# Altium PCB Fast_Servo.PCBDOC (part 11 of 11)
Units mm, origin at the board's own origin, x right, y up, seen from the top; angles counter-clockwise.
Board outline 162.48 x 100 mm, 6 copper layers (Top, GP1(GND), L3, L4, P3V3, Bot), stack 1.716 mm thick; 668 components, 491 nets, 2308 pads, 1133 vias.
Unrouted connection lines stored in the file: 2.
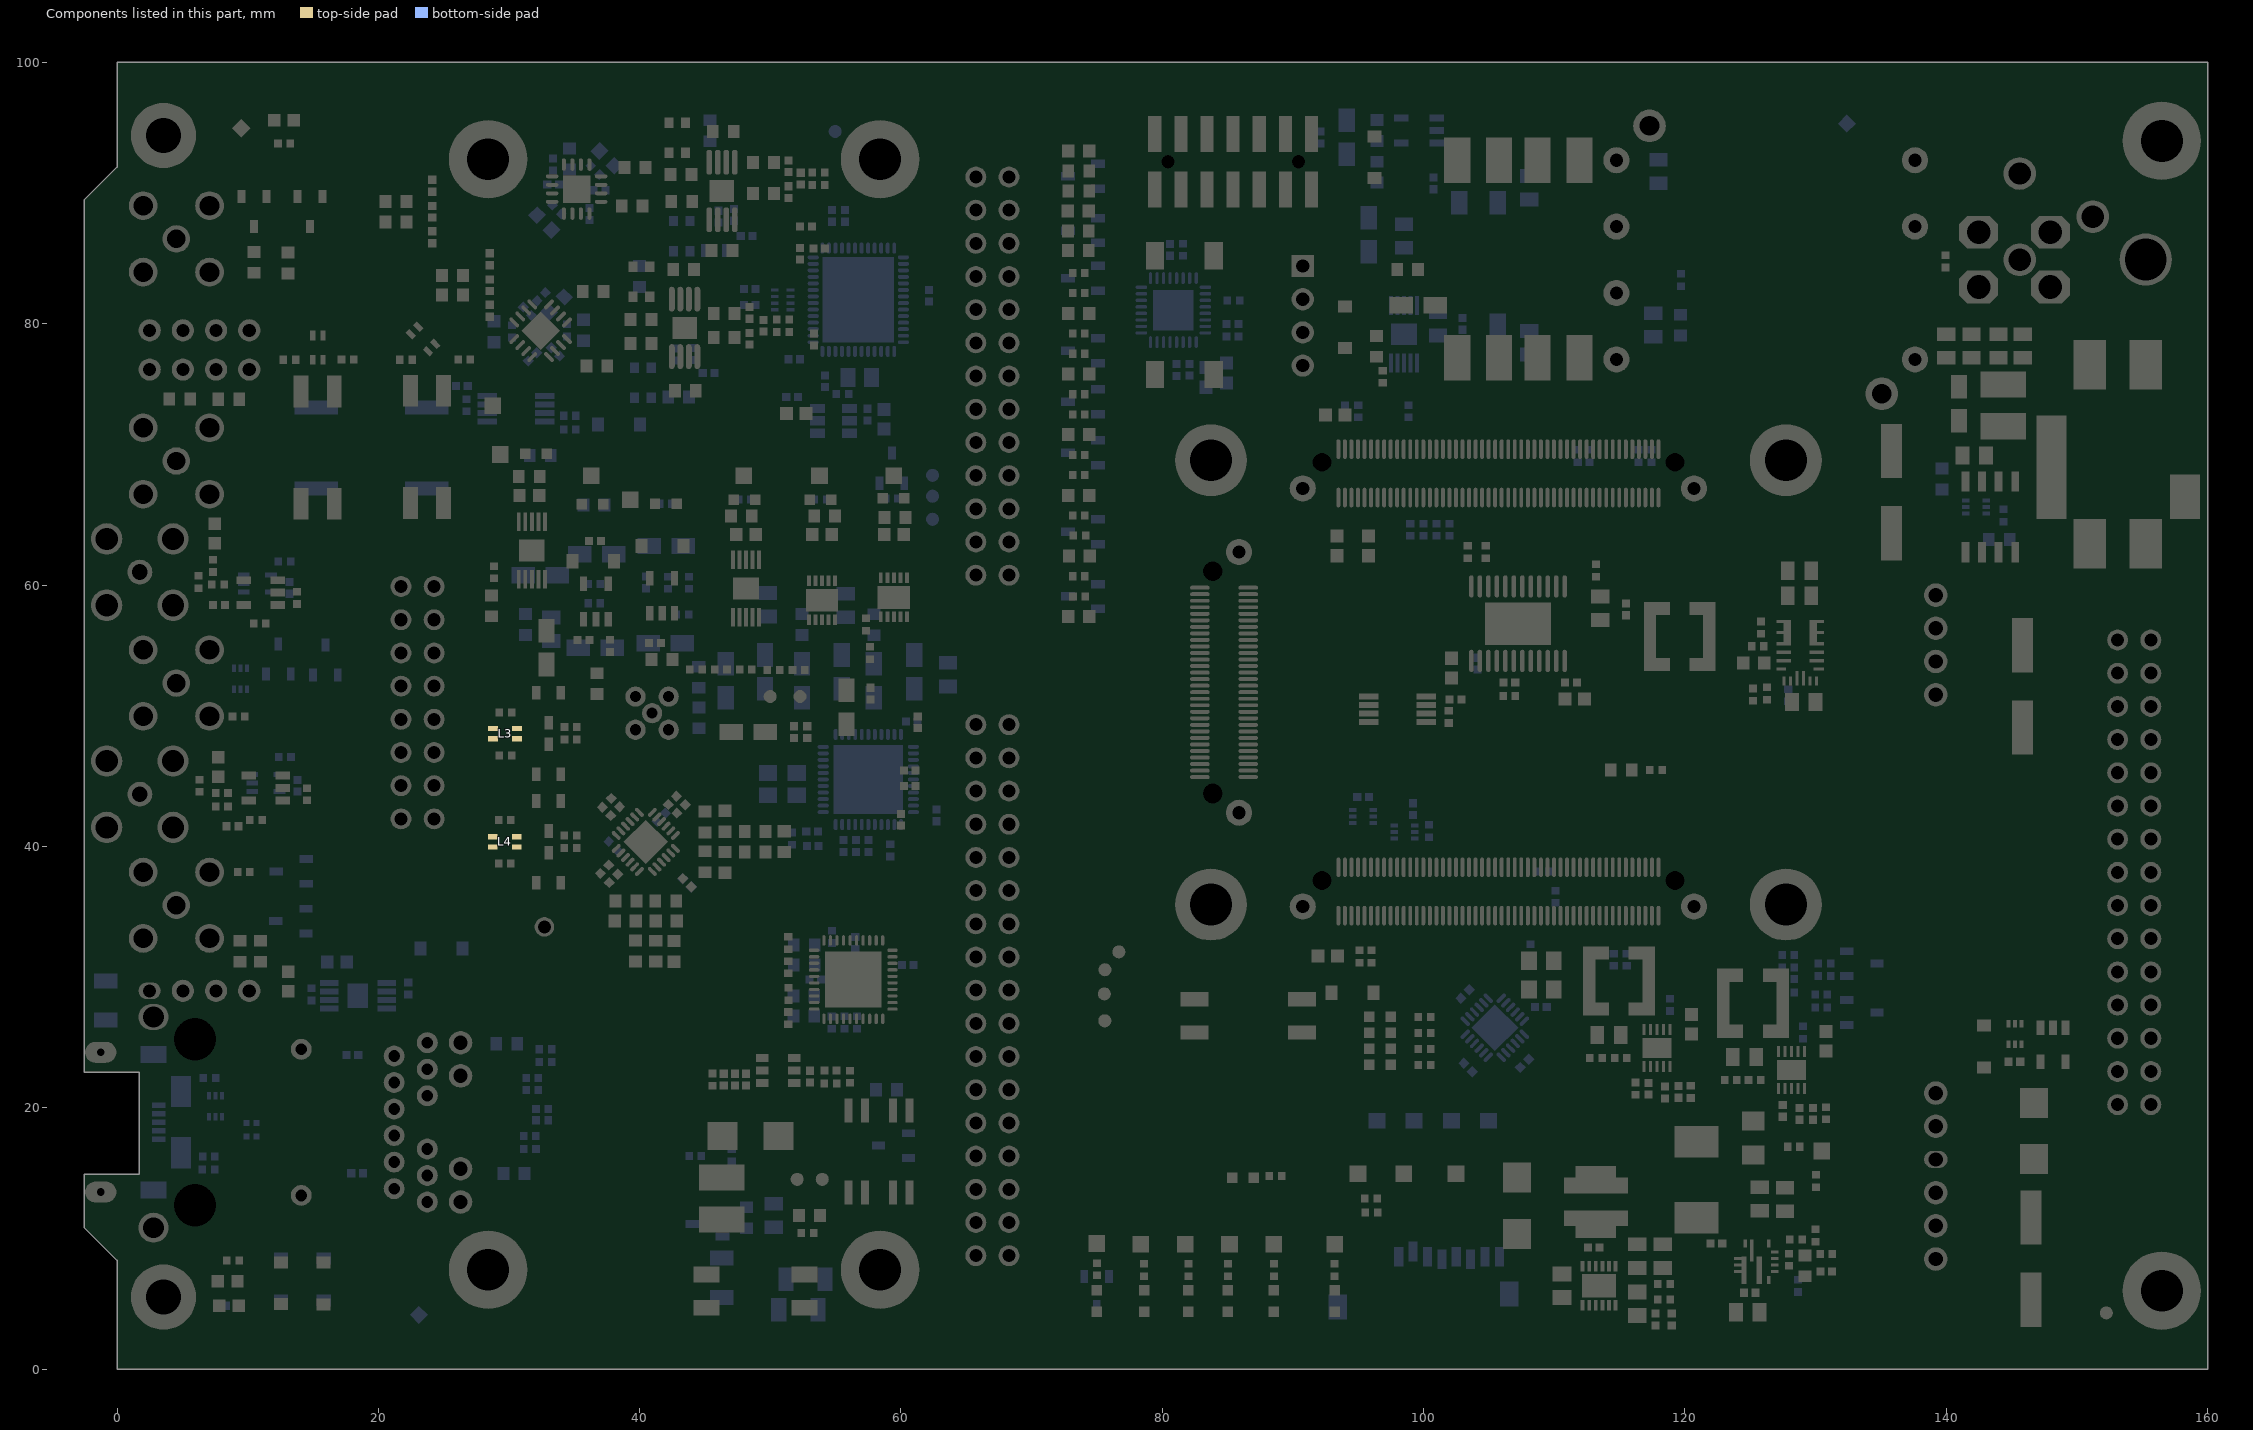
[diagram p13: the components of this part, seen from the top]

## Polygon pours and split planes (outlines as drawn) (continued)
P1V8A on Top "Top-P5V0A" (solid, pour order 304): 60.859,58.084 60.859,58.594 61.542,59.274 61.542,67.176 61.542,67.319 61.047,67.814 56.693,67.814 56.207,68.3 53.75,70.757 53.75,75.555 50.642,75.555 50.642,77.717 53.75,77.717 53.75,86.2 52.824,86.196 52.824,87.9 56.552,87.9 57.226,87.226 63.075,87.226 63.075,47.043 62.648,46.616 62.648,42.637 60.306,40.295 59.748,40.295 58.76,39.307 53.135,39.307 53.135,50.887 57.408,50.85 57.408,54.762 57.364,54.762 57.364,56.53 58.245,56.53 58.245,55.764 58.27,55.739 59.739,55.739 59.739,58.084
P5V5 on Top "Top-P5V5" (solid, pour order 599): 119.238,40.796 124.687,40.796 124.687,49.475 129,49.475 129,51.947 128.825,52.122 128.825,53.597 128.75,53.672 128.375,53.672 128.225,53.522 128.225,52.172 128.075,52.022 124.8,52.022 124.687,51.909 124.687,59.052 119.257,59.059
P3V3_LDO_1 on Top "Top-P6V0 2" (solid, pour order 596): 61.504,65.785 59.331,65.785 59.331,63.08 59.808,62.603 59.808,60.167 61.504,60.167
GND on Top "NONET_L-01_P-001" (solid, pour order 580): 128.918,21.898 128.918,20.644 128.179,19.905 126.941,19.905 126.643,19.607 126.643,18.604 127.316,17.932 131.447,17.932 131.762,18.247 131.762,20.828 130.692,21.898 129.155,21.898
P12V0POE on Top "NONET_L-01_P-001" (solid, pour order 604): 134,66.25 134,62.175 135.75,60.425 135.75,52.57 136.57,51.75 148.75,51.75 150.25,53.25 150.25,58.5 150.168,58.5 146.471,62.197 146.471,63.779 145.75,64.5 140.879,64.5 138.379,67 134.75,67
P12V0 on Top "NONET_L-01_P-001" (solid, pour order 593): 109.15,6.155 111.5,6.155 111.625,6.03 111.625,5.535 111.785,5.375 112.383,5.375 112.438,5.32 112.438,4.103 112.355,4.02 109.445,4.02 109.15,4.315
P5V5_LDO3 on Top "Top-P6V0 2" (solid, pour order 298): 55.971,65.804 54.107,65.804 54.107,62.791 54.276,62.622 54.276,59.82 55.971,59.82
P3V3_LDO_2 on Top "Top-P3V3 1" (solid, pour order 595): 31.853,69.287 31.853,63.674 33.925,63.674 33.925,69.287
N5V5_LDO2 on Top "Top-N2V5A" (solid, pour order 282): 35.78,52.687 35.78,56.566 38.221,56.566 39.57,56.566 39.57,52.687
P5V5_LDO5 on Top "Top-P6V0 2" (solid, pour order 152): 50.177,65.804 48.005,65.804 48.005,63.099 48.482,62.622 48.482,61.217 50.177,61.217
P12V0A on Top "Top-P12V0A" (solid, pour order 450): 92.316,84.388 92.308,79.791 96.625,79.791 96.625,84.4
P13V0 on Top "Top-P13V0" (solid, pour order 412): 99.975,79.941 99.975,73.406 104.176,73.406 104.176,79.941
GND on Top "Top-GND" (solid, pour order 608): 46.092,58.305 46.13,58.266 50.507,58.266 50.506,61.217 47.385,61.217 47.99,64.595 46.112,64.595 46.112,58.325
P5V0A on Top "Top-P5V0A" (solid, pour order 506): 52.694,70.75 53.957,70.75 53.957,71.973 53.937,71.993 53.937,74.914 51.8,74.914 51.8,71.993 40.245,71.993 40.245,67.707 43.108,67.707 43.763,67.176 50.105,67.201 50.125,58.445 48.06,58.445 48.06,54.204 51.8,54.204 51.8,69.856
GND on Top "Top-GND 12" (solid, pour order 344): 58.748,61.401 58.753,61.397 59.105,61.397 59.105,63.29 59.305,63.49 59.313,64.262 57.419,64.262 57.419,58.286 57.457,58.247 58.183,58.247
PWR_BANK13 on Top "Top-PWR_BANK13" (solid, pour order 554): 96.325,65.75 97.17,64.904 98.55,64.904 98.55,59.636 97.325,58.411 90.623,58.411 88.949,60.084 80.084,60.084 78.787,58.787 74.199,54.199 64.971,54.199 64.971,55.473 73.914,55.473 83.694,65.254 87.367,65.254 92.221,60.4 97.081,60.4 97.081,62.875 94.448,62.875 94.448,64.977 94.725,65.254 94.725,67.918 96.325,67.918
N5V5 on Top "NONET_L-01_P-001" (solid, pour order 591): 111.705,8.47 112.375,8.47 112.475,8.37 112.438,8.333 112.438,7.432 112.525,7.345 115.158,7.345 115.271,7.458 115.271,8.191 115.725,8.645 119.007,8.645 119.184,8.468 119.184,7.049 119.085,6.95 117.48,6.95 117.362,6.832 117.362,5.139 117.118,4.895 115.65,4.895 115.075,5.47 111.88,5.47 111.705,5.645
GND on Top "NONET_L-01_P-001" (solid, pour order 592): 111.6,6.5 111.6,9.425 110.525,10.5 110.525,12.15 110.8,12.425 115.65,12.425 115.85,12.225 115.85,10.739 115.225,10.114 115.225,8.725 119.05,8.725 119.325,9 119.325,9.85 118.775,10.4 118.775,16.272 117.362,17.685 110.81,17.685 109.225,16.1 109.225,6.5
P12V0 on Top "NONET_L-01_P-001" (solid, pour order 587): 124.807,2.645 124.807,8.765 124.602,8.97 119.867,8.97 119.382,8.485 119.382,2.82 119.832,2.37 124.532,2.37
GND on Top "NONET_L-01_P-001" (solid, pour order 589): 124.982,2.645 124.982,7.895 125.332,7.895 125.487,8.05 125.487,8.62 126.122,8.62 126.122,6.44 126.407,6.155 130.242,6.155 131.382,7.295 131.382,9.745 130.722,10.405 125.777,10.405 124.527,11.655 124.527,12.595 124.902,12.97 130.307,12.97 133.082,10.195 133.082,5.67 129.757,2.345 125.282,2.345
P12V0 on Top "NONET_L-01_P-001" (solid, pour order 605): 141.935,73.396 141.935,65.95 141.765,65.78 141.795,65.75 146.25,65.75 146.25,73.396
P12V0 on Top "ML1_BAL" (solid, remove dead copper, pour order 78): 152.549,60.222 154.393,60.222 154.393,48.052 156.393,46.052 156.393,41.052 156.393,27.634 144.2,15.441 144.2,3.425 159.393,3.425 159.393,65.771 152.549,65.817
P3V3 on Top "Top-P3V3 2" (solid, pour order 598): 93.246,74.196 93.246,68.554 95.165,68.554 95.167,74.196
P3V3 on Top "Top-P3V3 3" (solid, pour order 597): 92.662,30.32 94.625,30.32 94.625,36.111 92.695,36.111
N13V0 on Top "Top-N13V0" (solid, pour order 438): 98.325,95.694 98.325,93.391 98.325,89.511 104.176,89.511 104.176,95.694
P5V5 on Top "NONET_L-01_P-001" (solid, pour order 594): 121.957,20.404 121.957,19.109 123.66,19.112 123.66,17.395 126.512,17.395 126.577,17.33 126.577,20.404
P5V5SW on Top "NONET_L-01_P-001" (solid, pour order 590): 123.482,13.12 123.107,13.495 119.082,13.495 118.782,13.795 118.782,18.845 118.882,18.945 123.482,19 123.482,16.9 125.752,16.9 127.079,16.9 129.342,14.637 129.342,13.215 129.247,13.12
GND on Top "NONET_L-01_P-001" (solid, pour order 585): 129.075,50.022 129.075,62.2 131.425,62.2 131.425,50.397 130.975,49.947 129.2,49.947
GND on Top "Top-GND 9" (solid, pour order 448): 92.315,79.651 92.307,74.837 95.558,74.837 95.558,79.66
GND on Top "Top-GND 10" (solid, pour order 446): 93.982,92.598 93.975,88.438 98.125,88.438 98.125,92.61
N12V0A on Top "Top-N12V0A" (solid, pour order 444): 93.982,96.898 93.975,96.891 93.975,92.738 98.292,92.738 98.292,96.91
NetC115_1 on Top "NONET_L-01_P-001" (solid, pour order 588): 124.882,8.095 124.882,9.97 124.622,10.23 118.972,10.23 118.857,10.345 118.857,12.745 119.257,13.145 122.882,13.145 125.407,10.62 125.407,8.095
GND on Top "NONET_L-01_P-001" (solid, pour order 581): 131.762,24.648 129.537,24.648 129.477,24.588 129.477,23.706 127.393,23.706 127.393,24.853 127.28,24.966 124.484,24.966 124.468,24.95 124.468,23.057 122.143,23.057 122.043,22.957 122.043,20.489 125.854,20.489 125.854,21.241 126.643,22.03 130.887,22.03 131.445,21.473 131.762,21.473
P5V5 on Top "NONET_L-01_P-001" (solid, pour order 582): 128.918,23.757 128.918,24.854 129.123,25.06 130.004,25.06 130.347,24.716 131.723,24.716 131.762,24.756 131.762,26.781 131.412,27.132 128.268,27.132 128.155,27.019 128.155,25.185 127.821,24.85 127.821,23.713
P2V5 on Top "NONET_L-01_P-001" (solid, remove dead copper, pour order 583): 124.914,30.666 124.914,25.35 124.484,24.92 124.484,23.198 124.393,23.107 122.567,23.107 121.938,23.735 121.938,30.752 122.118,30.932 124.649,30.932
GND on Top "NONET_L-01_P-001" (solid, pour order 576): 118.625,23.583 118.625,22.329 117.886,21.59 116.648,21.59 116.35,21.292 116.35,20.289 117.022,19.617 121.154,19.617 121.469,19.932 121.469,22.513 120.399,23.583 118.862,23.583
GND on Top "NONET_L-01_P-001" (solid, pour order 577): 121.467,26.347 119.242,26.347 119.182,26.287 119.182,25.405 117.098,25.405 117.098,26.553 116.985,26.666 114.189,26.666 114.173,26.65 114.173,24.756 111.848,24.756 111.748,24.656 111.748,21.704 112.435,21.016 114.806,21.016 115.559,21.77 115.559,22.941 116.348,23.73 120.592,23.73 121.149,23.172 121.467,23.172
P5V5 on Top "NONET_L-01_P-001" (solid, pour order 578): 118.625,25.442 118.625,26.539 118.83,26.744 119.711,26.744 120.054,26.401 121.43,26.401 121.469,26.441 121.469,28.466 121.118,28.817 117.975,28.817 117.862,28.704 117.862,26.869 117.528,26.535 117.528,25.398
P1V8 on Top "NONET_L-01_P-001" (solid, pour order 579): 114.621,32.351 114.621,27.034 114.191,26.604 114.191,24.883 114.1,24.791 112.274,24.791 111.645,25.42 111.645,32.437 111.825,32.617 114.356,32.617
P3V3 on Top "NONET_L-01_P-001" (solid, pour order 586): 128.825,55.122 128.825,62 127.053,62 124.975,59.922 124.975,56.999 125.227,56.747 126.304,56.747 126.575,56.476 126.575,55.179 126.632,55.122
P5V5A on Top "Top-P5V5A" (solid, pour order 464): 119.077,58.155 119.077,51.775 114.423,51.775 111.275,54.923 111.275,58.155
P12V0FIL on Top "Top-P12V0FIL" (solid, pour order 352): 135.764,73.762 142.211,73.762 147.375,73.762 147.375,78.388 135.861,78.388 135.816,78.433 135.831,78.388 135.764,78.321
GND on Top "Top-GND 15" (solid, pour order 378): 151.389,73.825 159.601,73.825 159.601,65.929 151.389,65.929 151.389,61.311 147.348,61.311 147.348,63.753 146.471,63.753 146.471,73.825
N5V0A on Top "Top-N5V0A" (solid, pour order 250): 41.638,59.185 38.796,59.185 38.796,65.187 41.623,65.187
GND on Top "Top-GND 4" (solid, pour order 482): 92.124,62.875 92.126,60.4 97.081,60.4 97.081,62.875
P1V8 on Top "Top-P1V8 1" (solid, pour order 478): 94.725,65.254 94.489,65.018 94.489,62.999 92.125,62.999 92.125,65.137 92.655,65.667 92.655,68.379 94.725,68.379
GND on Top "Top-GND 7" (solid, pour order 460): 93.142,67.918 92.946,67.918 92.5,67.473 92.5,65.85 88.922,65.85 88.922,74.196 93.142,74.196
P3V3A on Top "Top-P5V0A" (solid, pour order 290): 52.375,54.204 52.375,56.549 52.712,56.549 52.712,55.783 52.737,55.758 54.206,55.758 54.206,58.327 56.534,58.327 56.534,54.204
GND on Top "Top-GND 12" (solid, pour order 296): 53.784,63.354 53.784,64.706 51.906,64.706 51.906,58.325 51.906,57.994 52.824,57.994
P2V5A on Top "Top-P2V5A 1" (solid, pour order 140): 29.5,52.65 29.5,50.863 32.872,50.863 32.872,52.525 34.249,52.525 34.249,56.797 34.3,56.849 34.3,61.149 31.652,61.149 31.652,58.865 30.803,58.865 30.803,59.614 29.5,59.614
GND on Top "Top-GND 8" (solid, pour order 458): 92.563,37.075 90.159,37.075 90.159,30.32 92.544,30.32
N2V5A on Top "Top-N2V5A" (solid, pour order 252): 36.62,62.548 36.62,65.312 34.428,65.312 34.428,62.42 36.62,62.42
P12V0F on Top "Top-P12V0F" (solid, pour order 86): 153.3,74.143 153.3,87.07 153.3,89.145 151.742,90.424 145.877,90.424 145.877,80.823 139.852,80.823 139.852,95.402 159.664,95.402 159.664,74.143
GND on Top "Top-GND 16" (solid, pour order 516): 135.816,78.524 147.25,78.524 147.25,80.625 135.801,80.625
N13V0FIL on Top "Top-N13V0FIL" (solid, pour order 436): 104.176,95.706 110.274,95.706 110.274,89.511 104.176,89.511
N13V0S on Top "Top-N13V0S" (solid, pour order 434): 110.369,89.511 118.876,89.511 118.876,95.709 110.369,95.709
P13V0FIL on Top "Top-P13V0FIL" (solid, pour order 410): 104.176,79.941 110.274,79.941 110.274,73.396 104.198,73.396 104.176,73.418
P13V0S on Top "Top-P13V0S" (solid, pour order 408): 110.369,73.44 110.325,73.396 118.876,73.396 118.876,79.941 110.369,79.941
GND on Top "Top-GND 14" (solid, pour order 342): 57.409,60.167 60.695,60.167 60.695,58.184 57.4,58.184
GNDF on Top "Top-GNDF" (solid, pour order 88): 145.872,80.55 148.597,80.534 148.597,74.098 152.959,74.066 152.959,87.147 152.959,89.018 151.745,90.094 145.872,90.094
no net on L3 "NONET_L-01_P-001" (solid, pour order 611): 0.279,97.104 159.69,97.104 159.69,3.819 158.461,2.591 1.854,2.591 0.356,4.089 0.356,13.665 1.119,14.429 2.021,14.429 2.285,14.693 2.285,22.88 1.719,23.445 0.12,23.445 -1.99,25.555 -1.99,88.84 0.279,91.11
N5V0A on L3 "L3-N5V0A" (solid, pour order 500): 30.628,93.362 34.167,93.362 41.676,93.362 41.676,66.506 41.676,64.071 38.994,64.071 30.628,64.071
P5V5 on L3 "P5V5_L03_P575" (solid, remove dead copper, pour order 575): 51.325,65.84 51.325,61.01 51.325,59 50.425,58.1 41.725,58.1 33.745,50.12 26.645,43.02 26.645,32.68 27.7,31.625 28.75,31.625 29.075,31.95 29.05,31.975 29.05,33 29.05,42.348 35.117,48.415 37.416,48.415 45.244,56.244 52.394,56.244 52.625,56.474 52.625,59.554 53.696,60.625 53.696,65.84
N5V5 on L3 "NONET_L-01_P-001" (solid, pour order 601): 109.975,19.725 109.975,10.275 115.325,4.925 120.134,4.925 120.134,10.116 114.975,15.275 114.975,19.036 114.25,19.761 110.011,19.761
P5V5 on L3 "NONET_L-01_P-001" (solid, pour order 602): 118.75,43.75 118.75,40.484 124.327,34.907 124.327,25.952 121.504,25.952 121.5,29.05 118.75,29.103 114.226,24.58 114,24.353 114,21.039 118.289,16.75 127.457,16.75 134.75,24.043 134.75,39.468 130.218,44 119,44
P12V0 on L3 "NONET_L-01_P-001" (solid, pour order 606): 143.5,71.75 151.484,71.75 154.5,68.734 154.5,61.272 153.101,59.874 149.526,59.874 147.096,62.304 147.096,65.646 144.992,67.75 143.5,67.75 143,68.25 143,71.372
P2V5 on L3 "NONET_L-01_P-001" (solid, pour order 603): 119.058,45.75 119.225,45.583 119.225,44.725 118.496,43.996 118.496,40.331 122.75,36.077 122.75,29.877 122.123,29.25 118.476,29.25 115.75,31.976 115.75,45.171 116.329,45.75 116.75,45.75
PWR_BANK13 on L3 "L3-PWR_BANK13 1" (solid, pour order 544): 60.64,49.305 60.64,47.805 62.717,47.805 64.786,49.874 66.795,51.883 66.795,55.46 65.026,55.46 65.026,53.691
no net on Bot "NONET_L-01_P-001" (solid, pour order 613): 0.279,97.104 159.69,97.104 159.69,3.819 158.461,2.591 1.854,2.591 0.356,4.089 0.356,13.665 1.119,14.429 2.021,14.429 2.285,14.693 2.285,22.88 1.719,23.445 0.12,23.445 -1.99,25.555 -1.99,88.84 0.279,91.11
GND on Bot "Bot-GND" (solid, pour order 609): 109.928,82.593 112.317,82.593 114.143,84.42 117.791,84.42 119.2,85.829 119.2,91.407 118.798,91.809 116.105,91.809 115.053,90.757 99.346,90.757 98.493,91.61 95.475,91.61 95.475,93.762 94.962,94.275 90.422,94.275 90.422,86.81 93.151,86.81 93.232,86.729 100.217,86.729 100.217,82.593 100.222,82.593 100.222,79.173 104.25,79.173 104.25,78.555 109.928,78.555 109.928,79.173
P12V0A on Bot "Bot-P12V0A" (solid, pour order 424): 98.665,80.067 100.275,80.078 100.275,86.81 96.796,86.81 92.598,86.81 92.598,79.668 93.183,79.668 96.856,79.668 96.856,82.459 96.856,82.713 96.856,83.006 96.856,83.168 98.651,83.168
P13V0 on Bot "Bot-P13V0" (solid, pour order 418): 98.65,79.625 98.65,74.916 103.975,74.916 103.975,75.325 103.975,79.625
GND on Bot "Bot-GND 5" (solid, pour order 150): 45.664,60.022 46.723,61.081 50.934,61.081 50.934,57.069 45.652,57.069
GND on Bot "Bot-GND 5" (solid, pour order 302): 51.226,61.081 56.949,61.081 56.949,57.069 51.208,57.069
GND on Bot "Bot-GND 5" (solid, pour order 350): 57.243,61.081 62.28,61.081 62.28,57.049 57.226,57.049
GND on Bot "Bot-GND 6" (solid, pour order 508): 64.93,51.277 63.957,50.305 63.522,50.305 45.431,50.305 45.431,52.953 64.93,52.953
N13V0 on Bot "Bot-N13V0" (solid, pour order 440): 99.65,95.35 103.975,95.35 103.975,90.757 103.94,90.791 99.463,90.791 99.065,91.189 99.065,95.329
GND on Bot "Bot-GND 3" (solid, pour order 430): 92.632,79.485 99.49,79.485 99.49,78.36 98.65,78.36 98.65,74.984 92.586,74.984
P13V0S on Bot "Bot-P13V0S" (solid, pour order 416): 121.407,79.88 121.407,75.068 120.724,75.068 113.206,75.068 113.206,79.836 113.206,79.88
P3V3A on Bot "Bot-P5V0A" (solid, pour order 300): 56.949,53.168 56.949,58.279 53.906,58.279 53.906,53.168
PWR_BANK13 on Bot "Bot-PWR_BANK13" (solid, pour order 548): 60.375,49 60.375,47.346 62.425,47.346 62.5,47.421 62.5,49
P1V8A on Bot "Bot-P1V8A" (solid, pour order 542): 50.634,77.74 52.853,77.74 53.382,78.199 53.665,78.482 54.717,78.482 54.834,78.366 54.834,75.561 54.77,75.497 50.61,75.497
N12V0A on Bot "Bot-N12V0A" (solid, pour order 442): 90.422,94.444 90.579,94.444 99.065,94.444 99.065,96.893 90.422,96.893
N13V0FIL on Bot "Bot-N13V0FIL" (solid, pour order 514): 103.975,95.35 110.375,95.35 110.375,90.894 110.281,90.894 103.975,90.894
P1V8A on Bot "Bot-P5V0A" (solid, pour order 348): 64.93,53.149 64.93,58.26 59.438,58.26 59.438,53.149
P13V0FIL on Bot "Bot-P13V0FIL" (solid, pour order 414): 104.229,78.555 109.917,78.555 109.917,74.784 104.229,74.784
P5V0A on Bot "Bot-P5V0A" (solid, pour order 144): 50.956,53.168 50.956,58.279 48.112,58.279 48.112,53.168
XTAL_GND on Bot "TOP_XTAL_GND" (solid, pour order 256): 53.6,45.8 52.45,46.95 48.877,46.95 48.508,46.581 48.508,43.239 48.997,42.75 52.825,42.75 53.2,43.125 53.2,43.55 53.525,43.875 53.525,44.225 53,43.7 49.975,43.7 49.25,44.425 49.25,45.95 49.425,46.125 52.075,46.125 52.575,45.625 53.6,45.625
no net on L4 "NONET_L-01_P-001" (solid, pour order 612): 0.279,97.104 159.69,97.104 159.69,3.819 158.461,2.591 1.854,2.591 0.356,4.089 0.356,13.665 1.119,14.429 2.021,14.429 2.285,14.693 2.285,22.88 1.719,23.445 0.12,23.445 -1.99,25.555 -1.99,88.84 0.279,91.11
P5V5 on L4 "L3-P5V5" (solid, pour order 566): 120.998,45.57 121.028,45.601 121.028,37.3 73.1,37.3 73.1,51.564 63,51.564 63,57.283 63,62.618 57.666,62.618 57.635,62.649 47.725,62.649 47.725,69.85 78.9,69.85 78.9,45.57
P1V8 on L4 "L3-P1V8" (solid, pour order 570): 85.35,50.239 85.35,63.226 94.631,63.226 94.631,68.614 97.05,71.033 97.05,82.57 94.631,84.989 62.131,84.989 62.131,80.141 86.047,80.141 86.175,80.269 86.07,69.718 78.95,69.717 78.95,45.489 85.722,45.489 85.822,45.589 121.9,45.589 121.9,37.1 111.275,37.043 111.275,24.353 116.055,24.353 116.055,31.7 125.407,31.7 125.408,37.119 134.1,37.1 134.1,50.239
N5V5 on L4 "L3-N5V5" (solid, pour order 498): 37.343,45.029 44.161,45.029 44.161,35.022 40.63,31.491 40.63,15.75 114.781,15.75 114.781,21.921 45.015,21.921 45.015,28.065 48.5,31.225 48.622,55.837 37.343,55.904
P5V0A on L4 "L3-P5V0A" (solid, pour order 496): 34.529,93.375 30.301,89.148 30.25,89.148 30.25,71.69 30.299,71.739 31.709,71.739 31.709,65.01 41.73,65.035 41.73,93.375
N12V0A on L4 "L4-N12V0A" (solid, pour order 512): 22.558,43.6 22.558,43.538 23,43.083 23,38.203 25.75,38.203 25.75,71.69 30.25,71.69 30.25,89.148 34.42,93.375 51.057,93.375 51.057,85.151 64.411,85.151 67,85.151 67.046,94.25 64.93,96.366 64.93,96.5 20.43,96.5 20.502,43.6
PWR_BANK13 on L4 "L3-PWR_BANK13" (solid, pour order 572): 96.8,60.76 96.8,65.45 94.633,65.45 94.633,63.272 94.7,63.204 94.7,63.134 85.731,63.134 85.628,63.237 85.4,63.009 85.4,50.4 94.7,50.4 116.725,50.4 116.725,54.305 89.75,54.305 89.75,60.76
P2V5A on L4 "L3-P2V5A 1" (solid, pour order 504): 40.575,31.744 40.554,31.744 43.945,35.134 43.941,44.945 39.941,44.945 39.941,36.809 39.805,36.674 35.219,36.674 35.219,36.809 30.628,36.809 30.628,65.095 31.699,65.095 31.699,71.594 25.75,71.594 25.75,31.744
P3V3A on L4 "L3-P3V3A" (solid, pour order 568): 62.196,80.152 62.196,85.07 51.077,85.07 51.077,93.375 41.73,93.375 41.73,55.973 48.5,55.973 48.5,31.225 44.925,28.085 44.925,22.239 46.792,22.239 46.792,26.039 53.008,26.039 53.008,32.5 62.895,32.5 62.895,62.588 47.556,62.588 47.557,69.979 86.125,69.979 86.125,80.152
P12V0 on L4 "L4-P12V0" (solid, pour order 607): 108.25,2.249 109.749,0.75 149,0.75 151.25,3 151.25,8.575 149.825,10 145.745,10 142.245,6.5 119.95,6.5 119.95,23.92 73.1,23.92 73.1,51.399 63,51.399 63,20.814 116.25,20.814 116.25,6.5 109.25,6.5 108.25,5.5
GND on L4 "L3-AGND" (solid, pour order 234): 62.895,22.4 46.791,22.4 46.793,26.005 53.026,26.005 53.026,32.47 62.895,32.47
N2V5A on L4 "L3-N2V5A" (solid, pour order 502): 38.761,65.004 41.676,65.004 41.676,56.018 37.343,56.018 37.343,44.945 39.941,44.945 39.941,36.809 30.675,36.809 30.675,65.004
P12V0A on L4 "L4-P12V0A" (solid, pour order 510): 22.558,43.557 23,43.115 23.027,43.05 23.027,38.176 17.4,38.176 17.4,98.2 66.8,98.2 70,95 70,85.2 67,85.2 67,94.488 64.988,96.5 20.25,96.5 20.25,43.557
GND on GP1(GND) (split plane): 159.484,0.51 0.51,0.51 0.51,8.32 0.501,8.419 0.472,8.515 0.424,8.603 0.361,8.681 -1.979,11.02 -1.979,14.39 1.7,14.39 1.8,14.399 1.895,14.428 1.984,14.476 2.061,14.539 2.124,14.616 2.172,14.705 2.201,14.8 2.21,14.9 2.21,22.7 2.201,22.8 2.172,22.895 2.124,22.984 2.061,23.061 1.984,23.124 1.895,23.172 1.8,23.201 1.7,23.21 -1.979,23.21 -1.979,89.299 0.361,91.639 0.424,91.716 0.472,91.805 0.501,91.9 0.51,92 0.51,99.489 159.484,99.489
P3V3 on P3V3 (split plane): 159.484,0.51 0.51,0.51 0.51,8.32 0.501,8.419 0.472,8.515 0.424,8.603 0.361,8.681 -1.979,11.02 -1.979,14.39 1.7,14.39 1.8,14.399 1.895,14.428 1.984,14.476 2.061,14.539 2.124,14.616 2.172,14.705 2.201,14.8 2.21,14.9 2.21,22.7 2.201,22.8 2.172,22.895 2.124,22.984 2.061,23.061 1.984,23.124 1.895,23.172 1.8,23.201 1.7,23.21 -1.979,23.21 -1.979,89.299 0.361,91.639 0.424,91.716 0.472,91.805 0.501,91.9 0.51,92 0.51,99.489 159.484,99.489
XTAL_GND on P3V3 (split plane): 53.071,46.596 53.071,42.85 52.85,42.629 48.898,42.629 48.379,43.148 48.379,45.779 48.379,46.446 49.054,47.121 52.546,47.121

## Keep-outs
Top:
  lines w0.1: 6.075,3.05 6.075,4.5 6.275,4.7 6.275,5.025
  lines w0.254: -2.413,25.349 -2.413,89.245 -0.269,91.389 5.639,91.389 6.325,92.075 6.325,93.523 ; 6.325,95.174 6.325,96.597 6.782,97.053 139.743,97.053 141.089,98.4 158.877,98.4 159.817,97.46 159.817,3.073 159.743,3 158.944,2.721 56.137,2.721 55.677,2.261 24.689,2.261 ; 6.35,4.7 6.35,3.251 7.341,2.261 19.149,2.261 19.888,3
L3:
  lines w0.508: 137.658,15.577 137.658,21.804 138.631,22.777 139.804,22.777 140.954,21.626 140.954,15.698
Bot:
  lines w0.1: 6.075,3.05 6.075,4.425 6.35,4.7 6.35,6.475 6.075,6.75 6.075,8.1
  lines w0.254: -2.464,12.344 -2.464,10.846 -0.33,8.712 4.801,8.712 6.35,7.163 6.35,6.475 ; -2.413,25.349 -2.413,89.245 -0.269,91.389 5.639,91.389 6.325,92.075 6.325,96.597 7.036,97.307 159.156,97.307 159.791,96.672 159.791,2.713 148.865,2.713 68.788,2.713 68.504,2.997 57.658,2.997 57.048,2.388 36.576,2.388 35.966,2.997 25.121,2.997 23.763,1.639 22.506,1.639 21.895,2.25 7.351,2.25 6.35,3.251 6.35,4.7 6.35,4.775 6.629,5.055 6.629,6.196 6.35,6.475 ; 6.35,7.214 6.35,6.475
  lines w0.508: 137.425,15.479 137.425,21.8 138.293,22.668 140.06,22.668 140.878,21.85 140.878,15.456
KeepOutLayer:
  drawing of 3462 lines, arcs and shapes, not listed

## Other copper
Top:
  rectangle net GND: 97.697,78.49 99.369,79.941
  rectangle net GND: 55.226,42.808 59.695,47.371
  rectangle net GND: 79.422,79.672 82.275,82.525
  rectangle net GND: 17.6,27.531 19.175,29.551
  rectangle net P5V5A: 116.21,52.849 118.979,58.908
  rectangle net GND: 110.125,13.02 116.369,16
  rectangle net P2V5: 117.186,44.746 118.987,45.356
  rectangle net P2V5: 118.712,29.476 124.284,30.981
  region net P2V5: 121.956,30.828 121.956,24.861 124.817,24.861 124.817,30.828
  region net P1V8: 111.85,32.517 111.85,26.867 114.4,26.867 114.4,32.517
  rectangle net P5V5: 119.397,52.905 122.935,58.908
L3:
  pour cut-out: 48.5,47 48.5,42.631 52.93,42.631 52.93,47.114 48.5,47.114
L4:
  pour cut-out: 136.53,6.223 141.364,6.223 141.364,22.78 136.565,22.78
  pour cut-out: 48.5,47 48.5,42.631 52.93,42.631 52.93,47.114 48.5,47.114
Bot:
  rectangle net GND: 127.317,22.045 128.965,23.756
  rectangle net GND: 117.028,23.756 118.712,25.383
  rectangle net GND: 45.349,89.257 47.657,91.004
  rectangle net GND: 42.592,78.692 44.299,80.642
P3V3 (plane layer: these items are gaps in the copper):
  region: 140.787,13.497 140.787,22.712 137.45,22.712 137.45,13.497
  region: 140.838,13.535 140.838,22.75 137.5,22.75 137.5,13.535
  lines w0.254: 48.25,43.095 48.845,42.5 49.655,42.5 52.903,42.5 53.2,42.797 53.2,46.65 52.6,47.25 49,47.25 48.25,46.5 48.25,45.779 48.25,43.095
GP1(GND) (plane layer: these items are gaps in the copper):
  rectangle: 48.1,42.35 53.325,47.396
  region: 140.85,13.535 140.85,22.75 137.512,22.75 137.512,13.535
  lines w0.254: 48.25,43.095 48.845,42.5 49.655,42.5 52.903,42.5 53.2,42.797 53.2,46.65 52.6,47.25 49,47.25 48.25,46.5 48.25,45.779 48.25,43.095

## Silkscreen, mask and mechanical layers (free items; w line width, h text height)
TopOverlay:
  drawing of 1238 lines, arcs and shapes, not listed
  text "JTAG" at 83.6,96.5 h1
  text "RESET" at 80.269,86.535 h1
  text "UART" at 89.48,86.16 h1
  text "P3V3" at 86.961,84.455 h1
  text "RX" at 87.642,81.595 h1
  text "TX" at 87.642,79.055 h1
  text "GND" at 86.961,76.457 h1
  text "GND" at 30.846,73.456 h1
  text "P2V5A" at 27.722,71.3 h1
  text "P1V8A" at 58.2,70.12 h1
  text "N2V5A" at 34.837,69.775 h1
  text "P5V0A" at 46.666,69.766 h1
  text "P3V3A" at 52.3,69.766 h1
  text "N5V0A" at 37.898,67.814 h1
  text "SCL" at 51.365,49.943 h1
  text "SDA" at 47.314,49.918 h1
  text "B13" at 115.975,48 h1
  text "EXT CLK" at 39.201,46.971 h1
  text "P1V8" at 113.991,46.775 h1
  text "P2V5" at 117.125,46.493 h1
  text "BEWARE OF ZynQ HP/HR B133 voltage" at 107.787,40.249 h1.02
  text "GND" at 29.064,33.738 h1
  text "DAC_SPI" at 71.699,33.03 h1
  text "nCS" at 72.742,31.55 h1
  text "SDIO" at 72.304,30.202 h1
  text "SCLK" at 72.022,28.287 h1
  text "EN" at 78.635,27.93 h1
  text "RESET" at 71.526,26.262 h1
  text "MODE" at 77.9,25.471 h1
  text "Fast Servo 1.0" at 30.275,18.125 h2
  text "I2C_SCL" at 100.975,16.505 h1
  text "I2C_SDA" at 96.125,16.45 h1
  text "WUT ISE 2021" at 30.115,16.181 h2
  text "OVERTEMP!!!" at 81.278,15.753 h2.03
  text "EEM Downstream" at 150.05,11.5 h1
  text "P3V3_MP" at 91.11,11.303 h1
  text "N5V5" at 77.3,11.1 h1
  text "P5V5" at 84.254,11.075 h1
  text "P1V8" at 73.9,11.055 h1
  text "P3V3" at 80.534,11.055 h1
  text "P12V0" at 87.557,11.055 h1
  text "P5V5_PGOOD" at 131.25,9.45 h1 r90
  text "/ Upstream" at 149.025,9.45 h1
BottomOverlay:
  drawing of 1237 lines, arcs and shapes, not listed
  text "SCK" at 55.825,95.675 h1
  text "ADC_SPI" at 63.55,74.1 h1 r90
  text "SDI" at 64.675,68.8 h1
  text "SDO" at 65.052,66.804 h1
  text "CS" at 64.465,65.274 h1
  text "Fast Servo 1.0" at 83.146,26.3 h2
  text "WUT ISE 2021" at 83.306,24.356 h2
TopSolder:
  circle w0.5: c104.283,26.125 r0.05
  circle w0.5: c105.45,24.958 r0.05
  circle w0.5: c106.617,26.125 r0.05
  circle w0.5: c105.45,26.125 r0.05
  circle w0.5: c105.45,27.292 r0.05
  circle w0.3: c58.362,79.672 r0.18
  circle w0.3: c56.734,79.739 r0.18
  circle w0.3: c55.035,79.672 r0.18
  circle w0.3: c55.035,81.887 r0.18
  circle w0.3: c56.734,81.821 r0.18
  circle w0.3: c58.362,81.887 r0.18
  circle w0.3: c58.362,84.103 r0.18
  circle w0.3: c56.734,84.103 r0.18
  circle w0.3: c55.035,84.103 r0.18
  rectangle: 97.69,78.49 99.409,79.941
  rectangle: 79.422,79.739 82.25,82.525
  rectangle: 55.25,42.95 59.733,47.346
  rectangle: 17.614,27.657 19.175,29.399
BottomSolder:
  circle w0.5: c40.475,41.875 r0.026
  circle w0.5: c39.075,40.375 r0.026
  circle w0.5: c40.475,38.95 r0.026
  circle w0.5: c42.025,40.375 r0.026
  circle w0.5: c33.197,79.47 r0.11
  circle w0.5: c32.419,78.692 r0.11
  circle w0.5: c31.641,79.47 r0.11
  circle w0.5: c32.419,80.248 r0.11
  circle w0.5: c35.727,89.762 r0.11
  circle w0.5: c34.627,89.762 r0.11
  circle w0.5: c34.627,90.862 r0.11
  circle w0.5: c35.727,90.862 r0.11
  rectangle: 117.028,23.75 118.712,25.318
  rectangle: 58.75,58.455 60.208,59.744
  rectangle: 53.05,58.25 54.937,59.428
  rectangle: 54.5,27.75 58.4,31.75
  rectangle: 47.25,59.075 48.945,60.456
  rectangle: 45.5,89.336 47.25,91
  rectangle: 42.479,78.752 44.288,80.525
  rectangle: 127.25,22.025 129,23.75
Mechanical1:
  the board outline again, w0.127
Mechanical4:
  lines w0.1: -2.6,-14.238 -2.6,117.232
DrillDrawing:
  drawing of 451 lines, arcs and shapes, not listed
  text "Layer" at 14.08,167.677 h1.52
  text "Name" at 24.492,167.677 h1.52
  text "Material" at 58.264,167.677 h1.52
  text "Thickness" at 80.102,167.677 h1.52
  text "Constant" at 96.608,167.677 h1.52
  text "Board Layer Stack" at 111.083,167.677 h1.52
  text "TopOverlay" at 24.492,164.629 h1.52
  text "TopSolder" at 24.492,161.581 h1.52
  text "Solder Resist" at 58.264,161.581 h1.52
  text "0,010mm" at 80.102,161.581 h1.52
  text "3.5" at 96.608,161.581 h1.52
  text "Top Surface Finish" at 24.492,158.533 h1.52
  text "Nickel, Gold" at 58.264,158.533 h1.52
  text "0,004mm" at 80.102,158.533 h1.52
  text "1" at 14.08,155.485 h1.52
  text "Top" at 24.492,155.485 h1.52
  text "0,058mm" at 80.102,155.485 h1.52
  text "Dielectric1" at 24.492,152.437 h1.52
  text "PP-006" at 58.264,152.437 h1.52
  text "0,180mm" at 80.102,152.437 h1.52
  text "4.1" at 96.608,152.437 h1.52
  text "2" at 14.08,149.389 h1.52
  text "GP1(GND)" at 24.492,149.389 h1.52
  text "0,035mm" at 80.102,149.389 h1.52
  text "Dielectric 3" at 24.492,146.341 h1.52
  text "Core-009" at 58.264,146.341 h1.52
  text "0,460mm" at 80.102,146.341 h1.52
  text "4.5" at 96.608,146.341 h1.52
  text "3" at 14.08,143.293 h1.52
  text "L3" at 24.492,143.293 h1.52
  text "0,035mm" at 80.102,143.293 h1.52
  text "Dielectric 2" at 24.492,140.245 h1.52
  text "PP-006" at 58.264,140.245 h1.52
  text "0,180mm" at 80.102,140.245 h1.52
  text "4.1" at 96.608,140.245 h1.52
  text "4" at 14.08,137.197 h1.52
  text "L4" at 24.492,137.197 h1.52
  text "CF-004" at 58.264,137.197 h1.52
  text "0,035mm" at 80.102,137.197 h1.52
  text "Dielectric 1" at 24.492,134.149 h1.52
  text "Core-009" at 58.264,134.149 h1.52
  text "0,460mm" at 80.102,134.149 h1.52
  text "4.5" at 96.608,134.149 h1.52
  text "5" at 14.08,131.101 h1.52
  text "P3V3" at 24.492,131.101 h1.52
  text "CF-004" at 58.264,131.101 h1.52
  text "0,035mm" at 80.102,131.101 h1.52
  text "Dielectric2" at 24.492,128.053 h1.52
  text "PP-006" at 58.264,128.053 h1.52
  text "0,180mm" at 80.102,128.053 h1.52
  text "4.1" at 96.608,128.053 h1.52
  text "6" at 14.08,125.005 h1.52
  text "Bot" at 24.492,125.005 h1.52
  text "0,058mm" at 80.102,125.005 h1.52
  text "Bottom Surface Finish" at 24.492,121.957 h1.52
  text "Nickel, Gold" at 58.264,121.957 h1.52
  text "0,004mm" at 80.102,121.957 h1.52
  text "BottomSolder" at 24.492,118.909 h1.52
  text "Solder Resist" at 58.264,118.909 h1.52
  text "0,010mm" at 80.102,118.909 h1.52
  text "3.5" at 96.608,118.909 h1.52
  text "BottomOverlay" at 24.492,115.861 h1.52

## Text inside footprints (layer, text, board x,y; h text height)
IC12: TopOverlay "1" at 139.75,6.311 h1.2 r90; Mechanical14 "1" at 139.75,6.311 h1.2 r90
J2: TopOverlay "30" at 157.051,20.873 h1.02 r270; Mechanical14 "30" at 157.051,20.873 h1.02 r270
J3: TopOverlay "26" at 64.333,90.605 h1.02 r90; Mechanical14 "26" at 64.333,90.605 h1.02 r90
J4: TopOverlay "34" at 64.333,48.685 h1.02 r90; Mechanical14 "34" at 64.333,48.685 h1.02 r90
J7: Mechanical8 "Via KEEPOUT" at -2.97,13.685 h1 r90
J8: BottomOverlay "1" at 98.25,10 h1; BottomOverlay "8" at 106.15,10 h1; BottomOverlay "S" at 106.45,17 h1; BottomOverlay "G" at 102.45,17 h1; BottomOverlay "S" at 98.55,17 h1; BottomOverlay "G" at 96.75,17 h1
J16: TopOverlay "16" at 25.667,42.745 h1.02 r270; Mechanical14 "16" at 25.667,42.745 h1.02 r270
JB1: Mechanical13 "100" at 91.975,38.054 h0.7; Mechanical13 "99" at 92.425,34.554 h0.7; Mechanical13 "2" at 118.225,38.154 h0.7; Mechanical13 "1" at 118.225,34.454 h0.7
JB2: Mechanical13 "100" at 91.975,70.054 h0.7; Mechanical13 "99" at 92.425,66.554 h0.7; Mechanical13 "2" at 118.225,70.154 h0.7; Mechanical13 "1" at 118.225,66.454 h0.7
JB3: Mechanical13 "1" at 86.925,60.305 h0.7 r90; Mechanical13 "2" at 83.025,60.305 h0.7 r90; Mechanical13 "60" at 83.025,43.555 h0.7 r90; Mechanical13 "59" at 86.925,43.555 h0.7 r90
SW2A: TopOverlay "1" at 17.855,76.391 h1 r270; Mechanical14 "1" at 17.86,76.39 h1 r270
SW2B: TopOverlay "1" at 26.224,76.435 h1 r270; Mechanical14 "1" at 26.255,76.5 h1 r270
SW4: TopOverlay "2" at 83.407,24.328 h1 r270; TopOverlay "1" at 83.407,30.202 h1 r270; Mechanical14 "2" at 83.407,24.328 h1 r270; Mechanical14 "1" at 83.407,30.202 h1 r270